# Altium PCB FullSheetOLD.PcbDoc (part 7 of 8)
Units mm, origin at the board's own origin, x right, y up, seen from the top; angles counter-clockwise.
Board outline 132.46 x 194.44 mm, 4 copper layers (Top Copper, L2_GND, L3_PWR_SIG, Bottom Copper), stack 1.586 mm thick; 495 components, 210 nets, 2171 pads, 1027 vias.
Unrouted connection lines stored in the file: 53.
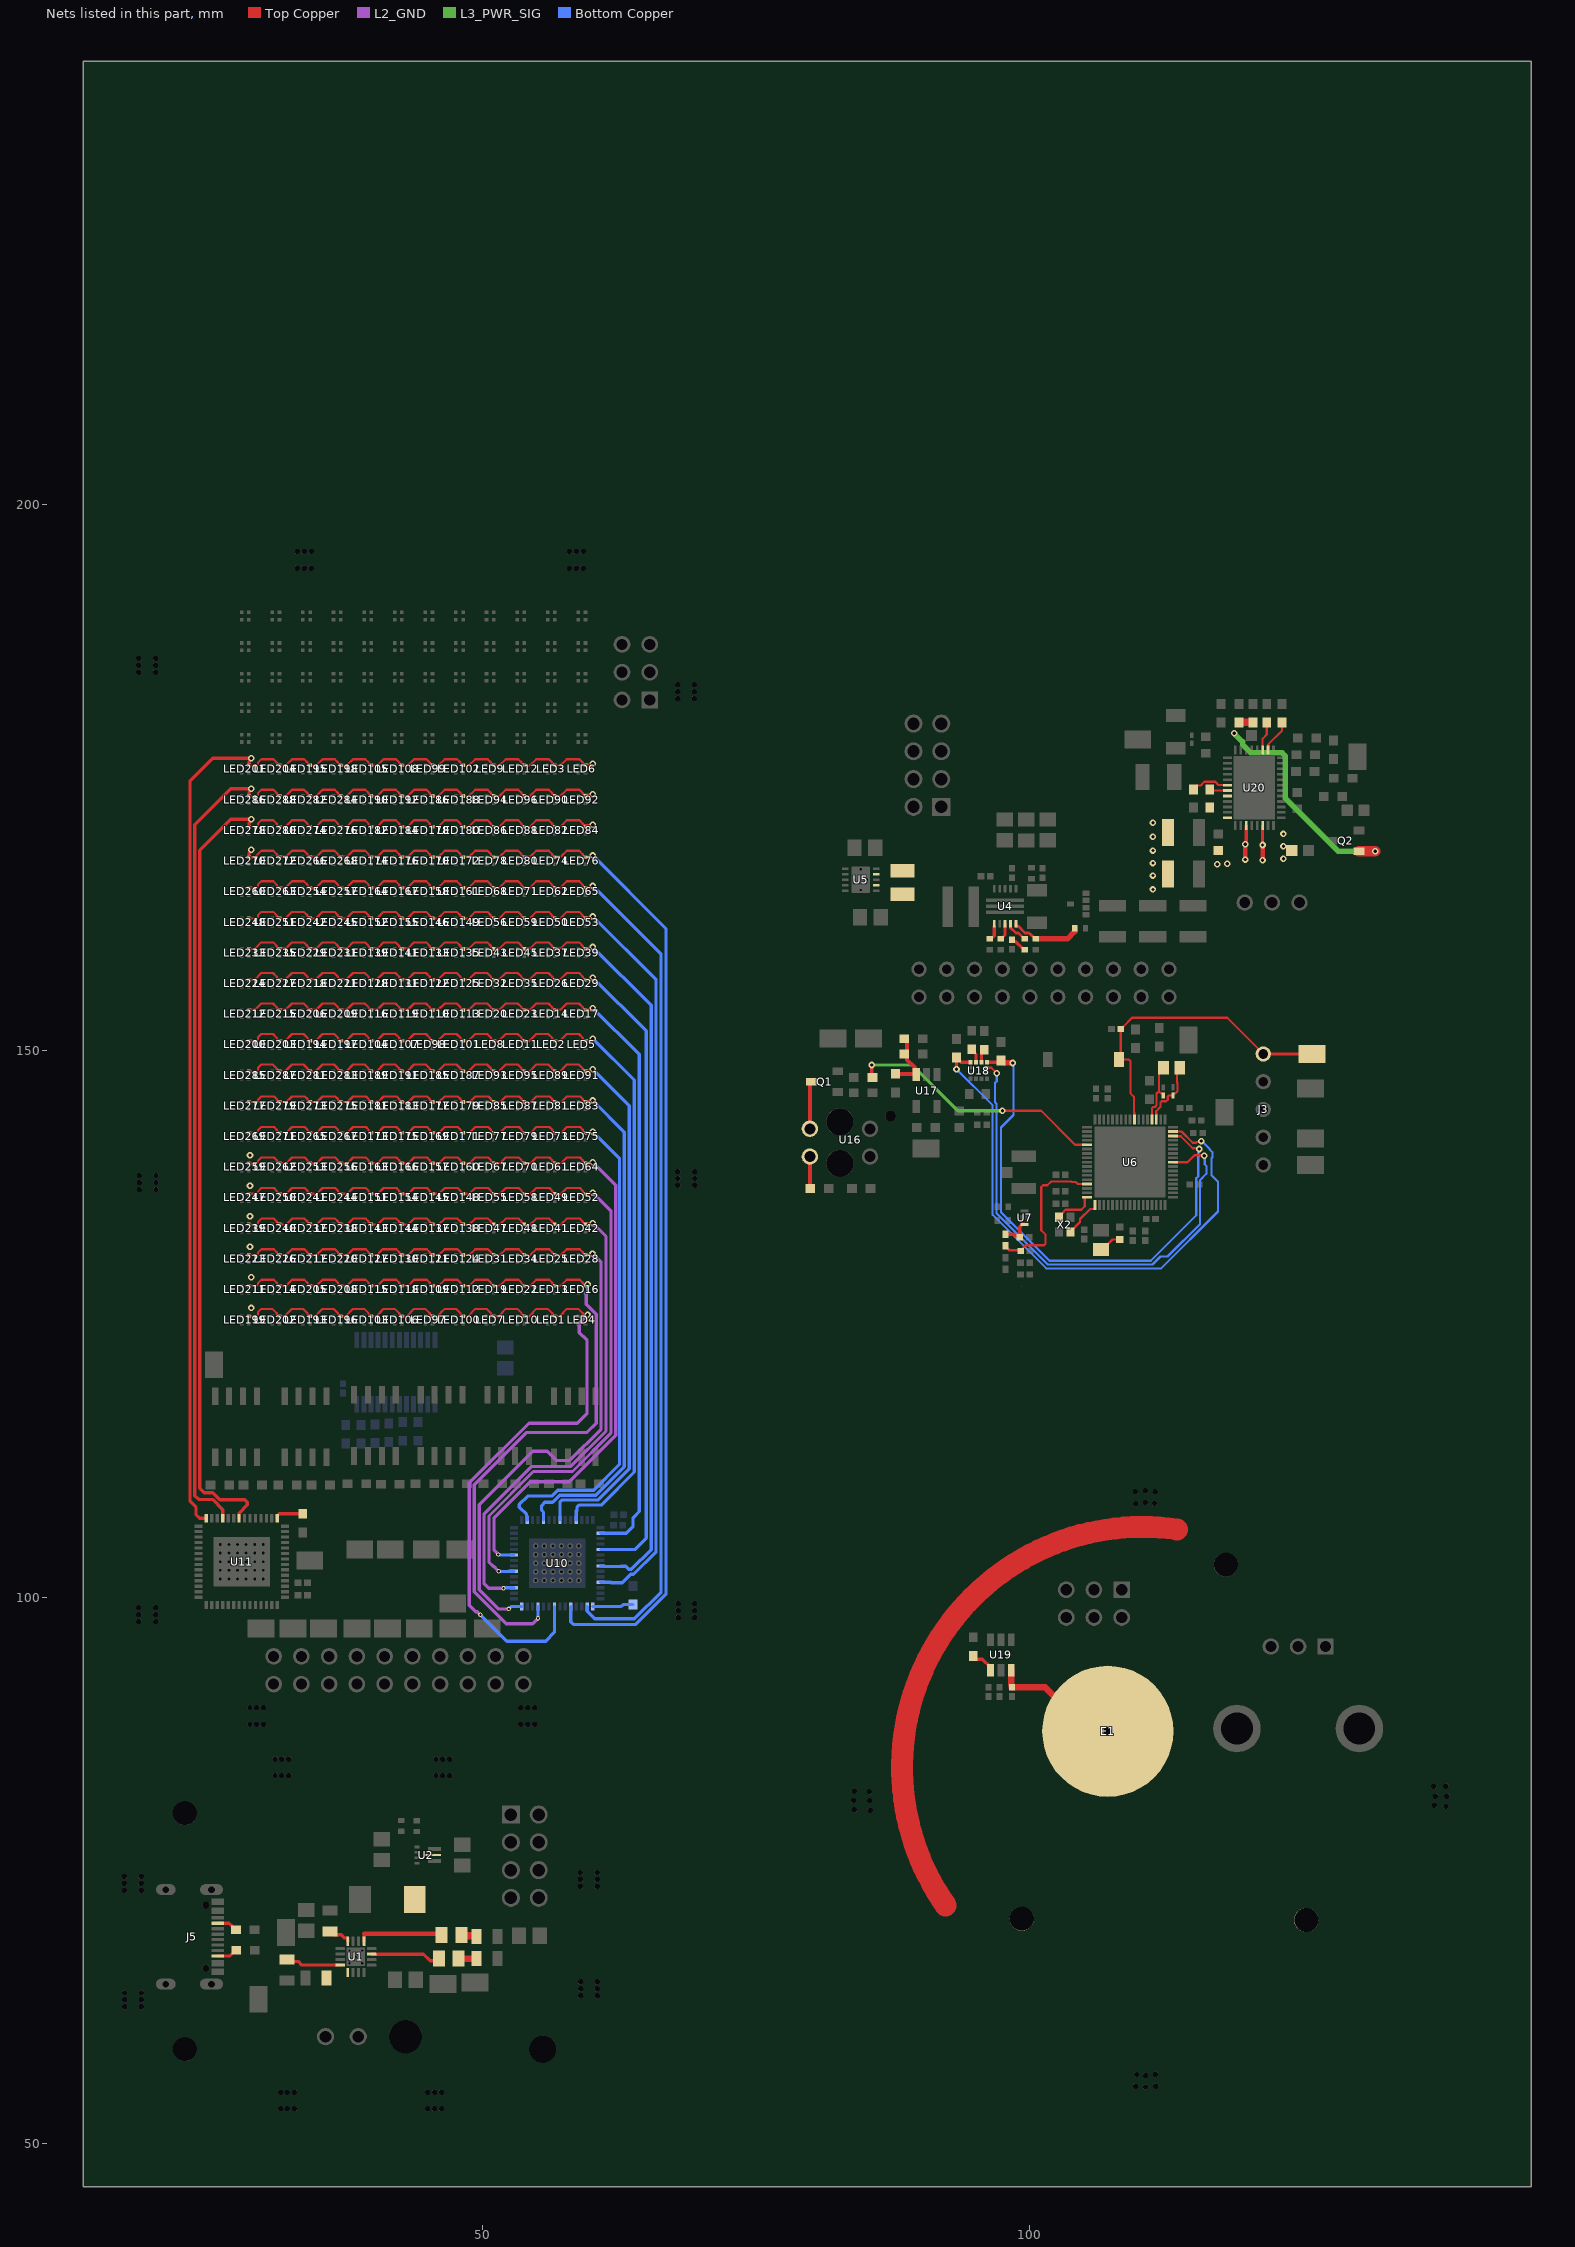
[diagram p8: the nets of this part, all layers, seen from the top]

## Via types
v1: diameter 0.6, hole 0.3, Top Copper to Bottom Copper, 857 vias
v2: diameter 0.8, hole 0.4, Top Copper to Bottom Copper, 91 vias
v3: diameter 0.4, hole 0.2, Top Copper to Bottom Copper, 79 vias

## Nets (pads, with @x,y where several pads share a name; then routed paths per layer and width w, separated by ;. In a path a pad name is that pad's centre, name@x,y a point inside that pad or via, vN(x,y) a via of type N, cw(c..) or ccw(c..) an arc to the next point about the centre after c; other vN are vias at no path point) (continued)
NetC16_2: C16.2 R14.1 | length 1.5
  Top Copper w0.3: C16.2@98.425,160.166 98.425,160.145 98.561,160.009 98.783,160.009 99.518,159.274 R14.1@99.518,159.202
NetC35_1: C35.1 L6.1 U6.31 | length 14
  Top Copper w0.2: C35.1@99.198,131.78 99.318,131.78 99.417,131.88 99.417,131.992 99.656,132.23 101.356,132.23 101.473,132.347 101.473,133.223 101.092,133.604 101.092,137.541 101.261,137.71 101.658,137.71 101.994,138.046 103.855,138.046 103.901,138 104.282,138 104.455,137.827 U6.31@105.296,137.827
  Top Copper w0.25: L6.1@97.841,132.182 97.841,132.105 98.166,131.78 C35.1@99.198,131.78
NetC36_2: C36.2 L6.2 U7.1 | length 2.9
  Top Copper w0.3: L6.2@97.841,133.223 98.57,133.223 98.688,133.105 99.003,133.105 C36.2@99.139,132.969 99.139,133.904 99.373,134.137 U7.1@99.568,134.137
NetC49_2: C49.2 E1.1 pad.4@99.314,70.612 pad.4@125.349,70.485 U19.3 | length 63.2
  Top Copper w0.6: U19.3@98.359,93.338 98.364,93.333 98.364,92.433 98.368,92.428 98.368,92.035 98.417,91.986 98.417,91.797 C49.2@98.425,91.789 101.447,91.789 105.479,87.757 E1.1@107.188,87.757
  Top Copper w2: 92.35,71.824 cw(c110.363,84.455) 113.51,106.229
NetC54_2: C54.2 U20.8
NetC55_1: C55.1 U20.7 | length 1.7
  Top Copper w0.2: C55.1@116.522,173.927 116.621,173.828 U20.7@118.145,173.828
NetC55_2: C55.2 U20.6 | length 3.6
  Top Copper w0.2: C55.2@115.022,173.927 115.022,173.976 115.323,174.277 115.669,174.277 116.019,174.627 117.026,174.627 117.172,174.48 117.172,174.445 117.29,174.328 U20.6@118.145,174.328
NetD1_A: D1.A R1.1 | length 1.4
  Top Copper w0.7: D1.A@48.042,69.113 48.106,69.05 49.36,69.05 R1.1@49.423,68.986
NetD1_C: D1.C U1.9 | length 7.8
  Top Copper w0.3: U1.9@39.141,68.554 39.141,69.221 39.161,69.24
  Top Copper w0.4: 39.161,69.24 46.115,69.24 D1.C@46.242,69.113
NetD2_A: D2.A R2.1 | length 1.6
  Top Copper w0.6: D2.A@47.799,66.954 R2.1@49.423,66.954
NetD2_C: D2.C U1.7 | length 6.6
  Top Copper w0.3: U1.7@39.826,67.369 44.576,67.369 45.175,66.77 45.974,66.77 45.999,66.796 D2.C@45.999,66.954
NetJ5_A5: J5.A5 R50.2 | length 1.9
  Top Copper w0.3: J5.A5@25.756,70.199 26.781,70.199 27.12,69.859 27.12,69.846 27.37,69.596 R50.2@27.42,69.596
NetJ5_B5: J5.B5 R51.1 | length 1.9
  Top Copper w0.3: J5.B5@25.756,67.199 26.873,67.199 R51.1@27.392,67.718
NetL1_2: L1.2 U2.2
NetL3_1: L3.1 U5.2
NetL3_2: L3.2 U5.4
NetL4_1: L4.1 L5.2 | length 2.1
  Top Copper w0.2: L5.2@106.553,131.841 106.695,131.841 107.612,132.758 L4.1@108.27,132.758
NetQ1_3: Q1.3 U16.CATH | length 4.4
  Top Copper w0.381: U16.CATH@79.927,142.88 79.927,147.093 80.027,147.193 Q1.3@80.08,147.193
NetQ2_1: Q2.1 R63.2 R64.2 | length 22.5
  Top Copper w0.7: R63.2@119.189,180.062 R64.2@120.459,180.062
  Top Copper w1: Q2.1@130.168,168.277 131.644,168.277 v1(131.648,168.274)
  L3_PWR_SIG w0.5: v1(118.745,179.07) 119.524,178.291 119.524,178.037 120.283,177.278 123.131,177.278 123.424,176.985 123.424,173.121 128.271,168.274 v1(131.648,168.274)
NetR3_2: R3.2 U1.1
NetR4_2: R4.2 U1.12 | length 2.1
  Top Copper w0.3: R4.2@36.017,69.444 36.327,69.134 37.062,69.134 37.361,68.834 37.621,68.834 37.641,68.814 U1.12@37.641,68.554
NetR5_2: R5.2 U1.16 | length 5.1
  Top Copper w0.25: R5.2@32.106,66.878 R5.2@32.283,66.7
  Top Copper w0.3: R5.2@32.283,66.7 33.096,66.7 33.427,66.369 U1.16@36.956,66.369
NetR10_1: R10.1 R13.2 U4.5 | length 6.6
  Top Copper w0.25: U4.5@98.79,161.637 98.79,161.412 99.015,161.412 99.628,160.799 99.982,160.799 100.098,160.683 100.125,160.683 100.534,160.274 R13.2@100.584,160.274
  Top Copper w0.5: R13.2@100.584,160.274 101.208,160.274 101.219,160.263 103.497,160.263 104.144,160.91 R10.1@104.144,161.223
NetR11_2: R11.2 U4.1 | length 1.4
  Top Copper w0.3: R11.2@96.393,160.274 96.493,160.374 96.611,160.374 96.787,160.55 U4.1@96.787,161.437
NetR12_2: R12.2 U4.3 | length 1.6
  Top Copper w0.25: R12.2@97.409,160.274 97.459,160.274 97.79,160.605 U4.3@97.79,161.637
NetR14_2: R14.2 U4.4 | length 2.1
  Top Copper w0.25: U4.4@98.29,161.637 98.29,161.273 98.777,160.786 99.006,160.786 99.518,160.274 R14.2@99.568,160.274
NetR22_2: R22.2 U10.1 | length 3.8
  Bottom Copper w0.3: U10.1@60.057,99.176 62.655,99.176 62.832,99.353 R22.2@63.754,99.353
NetR23_2: R23.2 U11.1 | length 2.6
  Top Copper w0.3: U11.1@31.203,107.237 31.203,107.481 31.378,107.657 R23.2@33.528,107.657
NetR40_2: R40.2 U16.A | length 2.9
  Top Copper w0.381: U16.A@79.927,140.34 79.944,140.323 79.944,137.431 R40.2@79.961,137.414
NetR41_1: R41.1 R43.1 R44.2 U17.3 | length 5.7
  Top Copper w0.381: R44.2@87.757,147.916 87.787,147.887 89.637,147.887 89.662,147.861 U17.3@89.662,147.857 89.527,147.992 89.527,148.471 88.818,149.18 88.818,149.523 88.608,149.733 R41.1@88.558,149.733 ; R41.1@88.812,149.86 R43.1@88.812,151.257
NetR42_1: R42.1 U6.22 | length 23.9
  Top Copper w0.2: v1(97.547,144.526) 101.087,144.526 104.186,141.427 U6.22@105.296,141.427
  Top Copper w0.3: v1(85.598,148.717) 85.598,147.623 R42.1@85.647,147.574
  L3_PWR_SIG w0.3: v1(85.598,148.717) 89.281,148.717 93.472,144.526 v1(97.547,144.526)
NetR46_1: R46.1 U6.67 U18.4 | length 52.3
  Top Copper w0.2: U6.67@113.144,142.627 113.934,142.627 114.956,141.605 115.237,141.605 115.314,141.681 115.661,141.681 v1(115.737,141.758)
  Top Copper w0.3: v1(93.345,148.336) R46.1@93.345,149.391 93.345,149.341 93.595,149.091 93.649,149.091 93.771,148.969 U18.4@94.627,148.969
  Bottom Copper w0.2: v1(93.345,148.336) 96.647,145.034 96.647,135.014 101.551,130.11 112.063,130.11 117.263,135.31 117.263,138.036 116.671,138.628 116.671,140.182 116.755,140.266 116.755,140.733 116.483,141.005 116.483,141.062 115.788,141.758 v1(115.737,141.758)
NetR47_1: R47.1 U6.66 U18.1 | length 46.6
  Top Copper w0.2: U6.66@113.144,142.227 113.167,142.204 113.862,142.204 114.959,141.107 115.477,141.107 v1(115.554,141.031)
  Top Copper w0.3: U18.1@96.127,148.969 R47.1@97.026,148.969
  Top Copper w0.5: R47.1@97.538,149.008 97.538,148.958 97.559,148.937 98.415,148.937 98.453,148.899 v1(98.48,148.899)
  Bottom Copper w0.2: v1(98.48,148.899) 98.552,148.827 98.552,144.145 97.409,143.002 97.409,135.255 101.854,130.81 111.125,130.81 115.284,134.969 115.284,138.348 115.453,138.517 115.453,140.64 115.477,140.663 115.477,140.954 v1(115.554,141.031)
NetR48_1: R48.1 U18.2 | length 1.3
  Top Copper w0.3: U18.2@95.627,148.969 95.627,149.806 95.885,150.064 R48.1@95.885,150.114
NetR49_2: R49.2 U18.3 | length 1.3
  Top Copper w0.3: R49.2@94.742,150.153 94.742,150.103 95.127,149.718 U18.3@95.127,148.969
NetR53_2: R53.2 U19.1 | length 2.3
  Top Copper w0.3: R53.2@94.869,94.654 94.869,94.604 95.119,94.354 95.71,94.354 96.459,93.605 U19.1@96.459,93.338
NetR57_2: R57.2 U20.35 | length 2.7
  Top Copper w0.2: U20.35@121.349,177.531 121.349,178.571 121.73,178.952 R57.2@121.73,180.062
NetR58_2: R58.2 U20.34 | length 3.1
  Top Copper w0.2: U20.34@121.849,177.531 121.87,177.552 121.87,178.055 123.126,179.312 R58.2@123.126,180.062
NetU6_60: U6.60 U18.12 | length 45.8
  Top Copper w0.2: U18.12@96.137,148.459 96.524,148.459 v1(97.028,147.955) ; U6.60@113.144,139.827 114.482,139.827 115.117,140.462 115.953,140.462 v1(116.003,140.412)
  Bottom Copper w0.2: v1(97.028,147.955) 97.028,147.236 96.859,147.067 96.859,145.317 96.997,145.179 96.997,135.159 101.696,130.46 111.27,130.46 112.001,131.191 112.649,131.191 115.634,134.176 115.634,138.203 116.205,138.773 116.205,139.489 116.055,139.639 116.055,140.36 v1(116.003,140.412)
NRST: C19.2 J3.5 SW1.2 TP9.1 U6.8 | length 28.7
  Top Copper w0.2: U6.8@109.62,143.751 109.597,143.774 109.597,144.38 109.57,144.407 109.57,145.823 109.248,146.145 109.248,149.08 109.103,149.225 SW1.2@108.204,149.225 108.379,149.4 C19.2@108.379,152.019 108.4,152.019 108.586,152.205 108.586,152.227 109.395,153.035 118.11,153.035 J3.5@121.412,149.733
  Top Copper w0.3: J3.5@121.412,149.733 TP9.1@125.857,149.733
OSC_IN: U6.35 X2.1 | length 3.6
  Top Copper w0.2: X2.1@103.776,133.437 103.776,133.475 104.648,134.347 104.648,134.62 105.573,135.545 105.993,135.545 106.02,135.572 U6.35@106.02,135.903
OSC_OUT: U6.34 X2.3 | length 3.9
  Top Copper w0.2: X2.3@102.726,134.787 102.726,134.825 103.145,135.244 103.145,135.31 103.302,135.467 104.749,135.467 105.071,135.789 105.071,136.6 105.098,136.627 U6.34@105.296,136.627
PC14-OSC32_IN: C30.2 U6.3 X1.1 | length 5.8
  Top Copper w0.2: U6.3@111.62,143.751 111.611,143.76 111.611,144.496 111.998,144.882 111.998,145.279 112.115,145.396 112.524,145.396 112.67,145.543 112.67,145.809 112.788,145.926 C30.2@113.157,145.926 ; C30.2@113.157,146.05 113.209,146.102 113.36,146.102 113.559,146.302 113.559,147.062 113.526,147.096 X1.1@113.526,148.336
PC15-OSC32_OUT: C31.2 U6.4 X1.2 | length 5.5
  Top Copper w0.2: U6.4@111.22,143.751 111.243,143.774 111.243,144.764 111.36,144.881 111.502,144.881 111.648,145.027 111.648,145.746 111.648,146.108 111.816,146.276 111.889,146.276 ; X1.2@112.026,148.336 111.866,148.176 111.866,146.299 111.889,146.276 ; C31.2@112.268,146.047 112.216,146.1 112.065,146.1 111.889,146.276
PGND: C52.1 C53.1 C_VM_BK1.2 J10.1 U20.12 U20.15 U20.18 | length 6.7
  Top Copper w0.2: C53.1@112.435,169.737 C53.1@112.687,169.989
  Top Copper w0.3: v1(119.761,168.91) 119.761,168.991 119.848,169.079 U20.15@119.848,170.624 ; v1(121.349,168.846) U20.18@121.349,170.624
  Top Copper w0.4: v1(119.761,167.513) v1(119.761,168.91) ; v1(121.349,167.45) v1(121.349,168.846)
  other v1: 111.316,164.782 111.316,166.052 117.197,167.074 118.11,167.132 111.316,167.195 123.253,167.576 111.316,168.338 123.253,168.719 111.316,169.608 123.253,169.862 111.316,170.879
R0: LED1.3 LED4.3 LED7.3 LED10.3 LED97.3 LED100.3 LED103.3 LED106.3 LED193.3 LED196.3 LED199.3 LED202.3 U10.8 | length 84.2
  Top Copper w0.2: LED199.3@28.6,125.73 29.305,125.73 29.422,125.847 29.422,126.085 29.744,126.407 30.747,126.407 31.155,125.999 31.155,125.912 31.272,125.795 31.335,125.795 LED202.3@31.4,125.73 31.865,125.73 32.202,126.067 32.202,126.07 32.538,126.407 33.547,126.407 33.955,125.999 33.955,125.912 34.072,125.795 34.135,125.795 LED193.3@34.2,125.73 34.665,125.73 34.999,126.064 34.999,126.073 35.332,126.407 36.347,126.407 36.755,125.999 36.755,125.912 36.872,125.795 36.935,125.795 LED196.3@37,125.73 37.465,125.73 37.796,126.061 37.796,126.076 38.126,126.407 39.147,126.407 39.555,125.999 39.555,125.912 39.672,125.795 39.735,125.795 LED103.3@39.8,125.73 40.265,125.73 40.593,126.058 40.593,126.079 40.92,126.407 41.947,126.407 42.355,125.999 42.355,125.912 42.472,125.795 42.535,125.795 LED106.3@42.6,125.73 43.065,125.73 43.39,126.055 43.39,126.082 43.714,126.407 44.747,126.407 45.155,125.999 45.155,125.912 45.272,125.795 45.335,125.795 LED97.3@45.4,125.73 45.865,125.73 46.186,126.051 46.186,126.085 46.508,126.407 47.547,126.407 47.955,125.999 47.955,125.912 48.072,125.795 48.135,125.795 LED100.3@48.2,125.73 48.665,125.73 48.98,126.045 48.98,126.085 49.302,126.407 50.347,126.407 50.755,125.999 50.755,125.912 50.872,125.795 50.935,125.795 LED7.3@51,125.73 51.465,125.73 51.774,126.039 51.774,126.085 52.096,126.407 53.147,126.407 53.555,125.999 53.555,125.912 53.672,125.795 53.735,125.795 LED10.3@53.8,125.73 54.265,125.73 54.568,126.033 54.568,126.085 54.89,126.407 55.947,126.407 56.355,125.999 56.355,125.912 56.472,125.795 56.535,125.795 LED1.3@56.6,125.73 57.065,125.73 57.362,126.027 57.362,126.085 57.684,126.407 58.747,126.407 59.155,125.999 59.155,125.912 59.272,125.795 59.335,125.795 LED4.3@59.4,125.73
  Top Copper w0.3: LED4.3@59.4,125.73 59.527,125.857 v1(59.59,125.857)
  L2_GND w0.3: v3(49.784,98.425) 49.757,98.425 49.487,98.695 49.35,98.695 48.768,99.277 48.768,110.491 54.228,115.951 58.66,115.951 59.528,116.819 59.528,123.566 59.177,123.917 59.13,123.917 58.836,124.211 58.836,125.103 v1(59.59,125.857)
  Bottom Copper w0.3: v3(49.784,98.425) 52.208,96.001 55.754,96.001 56.557,96.804 U10.8@56.557,99.176
  other v1: 28.829,126.492
R1: LED13.3 LED16.3 LED19.3 LED22.3 LED109.3 LED112.3 LED115.3 LED118.3 LED205.3 LED208.3 LED211.3 LED214.3 U10.11 | length 81.3
  Top Copper w0.2: LED211.3@28.6,128.53 29.305,128.53 29.422,128.647 29.422,128.752 29.744,129.074 30.88,129.074 31.155,128.799 31.155,128.712 31.272,128.595 31.335,128.595 LED214.3@31.4,128.53 31.994,128.53 32.538,129.074 33.68,129.074 33.955,128.799 33.955,128.712 34.072,128.595 34.135,128.595 LED205.3@34.2,128.53 34.788,128.53 35.332,129.074 36.48,129.074 36.755,128.799 36.755,128.712 36.872,128.595 36.935,128.595 LED208.3@37,128.53 37.582,128.53 38.126,129.074 39.28,129.074 39.555,128.799 39.555,128.712 39.672,128.595 39.735,128.595 LED115.3@39.8,128.53 40.376,128.53 40.92,129.074 42.08,129.074 42.355,128.799 42.355,128.712 42.472,128.595 42.535,128.595 LED118.3@42.6,128.53 43.17,128.53 43.714,129.074 44.88,129.074 45.155,128.799 45.155,128.712 45.272,128.595 45.335,128.595 LED109.3@45.4,128.53 45.964,128.53 46.508,129.074 47.68,129.074 47.955,128.799 47.955,128.712 48.072,128.595 48.135,128.595 LED112.3@48.2,128.53 48.758,128.53 49.302,129.074 50.48,129.074 50.755,128.799 50.755,128.712 50.872,128.595 50.935,128.595 LED19.3@51,128.53 51.552,128.53 52.096,129.074 53.28,129.074 53.555,128.799 53.555,128.712 53.672,128.595 53.735,128.595 LED22.3@53.8,128.53 54.346,128.53 54.89,129.074 56.08,129.074 56.355,128.799 56.355,128.712 56.472,128.595 56.535,128.595 LED13.3@56.6,128.53 57.14,128.53 57.684,129.074 58.88,129.074 59.155,128.799 59.155,128.712 59.272,128.595 59.335,128.595 LED16.3@59.4,128.53
  Top Copper w0.3: LED16.3@59.4,128.53 59.521,128.651 v1(59.59,128.651)
  L2_GND w0.3: v3(55.057,98.105) 54.557,97.605 52.135,97.605 49.218,100.522 49.218,110.305 54.015,115.102 59.537,115.102 60.375,115.94 60.375,125.921 59.471,126.825 59.471,127.792 59.58,127.901 59.58,128.641 v1(59.59,128.651)
  Bottom Copper w0.3: v3(55.057,98.105) U10.11@55.057,99.176
  other v1: 28.829,129.286
R2: LED25.3 LED28.3 LED31.3 LED34.3 LED121.3 LED124.3 LED127.3 LED130.3 LED217.3 LED220.3 LED223.3 LED226.3 U10.14 | length 80.6
  Top Copper w0.2: LED223.3@28.6,131.33 29.305,131.33 29.422,131.447 29.422,131.546 29.744,131.868 30.886,131.868 31.155,131.599 31.155,131.512 31.272,131.395 31.335,131.395 LED226.3@31.4,131.33 32,131.33 32.538,131.868 33.686,131.868 33.955,131.599 33.955,131.512 34.072,131.395 34.135,131.395 LED217.3@34.2,131.33 34.794,131.33 35.332,131.868 36.486,131.868 36.755,131.599 36.755,131.512 36.872,131.395 36.935,131.395 LED220.3@37,131.33 37.588,131.33 38.126,131.868 39.286,131.868 39.555,131.599 39.555,131.512 39.672,131.395 39.735,131.395 LED127.3@39.8,131.33 40.382,131.33 40.498,131.446 40.498,131.546 40.82,131.868 42.086,131.868 42.355,131.599 42.355,131.512 42.472,131.395 42.535,131.395 LED130.3@42.6,131.33 43.176,131.33 43.714,131.868 44.886,131.868 45.155,131.599 45.155,131.512 45.272,131.395 45.335,131.395 LED121.3@45.4,131.33 45.97,131.33 46.508,131.868 47.686,131.868 47.955,131.599 47.955,131.512 48.072,131.395 48.135,131.395 LED124.3@48.2,131.33 48.764,131.33 49.302,131.868 50.486,131.868 50.755,131.599 50.755,131.512 50.872,131.395 50.935,131.395 LED31.3@51,131.33 51.558,131.33 52.096,131.868 53.286,131.868 53.555,131.599 53.555,131.512 53.672,131.395 53.735,131.395 LED34.3@53.8,131.33 54.352,131.33 54.89,131.868 56.086,131.868 56.355,131.599 56.355,131.512 56.472,131.395 56.535,131.395 LED25.3@56.6,131.33 57.146,131.33 57.684,131.868 58.886,131.868 59.155,131.599 59.155,131.512 59.272,131.395 59.335,131.395 LED28.3@59.4,131.33 59.457,131.387 59.983,131.387 v1(60.04,131.445)
  L2_GND w0.3: v3(52.378,98.952) 51.425,98.952 49.668,100.709 49.668,108.487 54.555,113.374 55.903,113.374 56.736,112.541 57.954,112.541 60.825,115.412 60.825,130.66 v1(60.04,131.445)
  Bottom Copper w0.3: v3(52.378,98.952) 52.405,98.952 52.629,99.176 U10.14@53.557,99.176
R3: LED41.3 LED42.3 LED47.3 LED48.3 LED137.3 LED138.3 LED143.3 LED144.3 LED237.3 LED238.3 LED239.3 LED240.3 U10.17 | length 80.1
  Top Copper w0.2: LED239.3@28.6,134.13 29.305,134.13 29.422,134.247 29.422,134.34 29.744,134.662 30.892,134.662 31.155,134.399 31.155,134.312 31.272,134.195 31.335,134.195 LED240.3@31.4,134.13 32.006,134.13 32.538,134.662 33.692,134.662 33.955,134.399 33.955,134.312 34.072,134.195 34.135,134.195 LED237.3@34.2,134.13 34.8,134.13 35.332,134.662 36.492,134.662 36.755,134.399 36.755,134.312 36.872,134.195 36.935,134.195 LED238.3@37,134.13 37.594,134.13 38.126,134.662 39.292,134.662 39.555,134.399 39.555,134.312 39.672,134.195 39.735,134.195 LED143.3@39.8,134.13 40.388,134.13 40.92,134.662 42.092,134.662 42.355,134.399 42.355,134.312 42.472,134.195 42.535,134.195 LED144.3@42.6,134.13 43.182,134.13 43.714,134.662 44.892,134.662 45.155,134.399 45.155,134.312 45.272,134.195 45.335,134.195 LED137.3@45.4,134.13 45.976,134.13 46.508,134.662 47.692,134.662 47.955,134.399 47.955,134.312 48.072,134.195 48.135,134.195 LED138.3@48.2,134.13 48.77,134.13 49.302,134.662 50.492,134.662 50.755,134.399 50.755,134.312 50.872,134.195 50.935,134.195 LED47.3@51,134.13 51.564,134.13 52.096,134.662 53.292,134.662 53.555,134.399 53.555,134.312 53.672,134.195 53.735,134.195 LED48.3@53.8,134.13 54.358,134.13 54.89,134.662 56.092,134.662 56.355,134.399 56.355,134.312 56.472,134.195 56.535,134.195 LED41.3@56.6,134.13 57.152,134.13 57.684,134.662 58.892,134.662 59.155,134.399 59.155,134.312 59.272,134.195 59.335,134.195 LED42.3@59.4,134.13
  Top Copper w0.3: LED42.3@59.4,134.13 59.415,134.145 59.896,134.145 59.99,134.239 v1(60.071,134.239)
  L2_GND w0.3: v3(51.896,100.836) 50.548,100.836 50.118,101.266 50.118,107.649 54.443,111.974 58.024,111.974 61.275,115.225 61.275,133.035 v1(60.071,134.239)
  Bottom Copper w0.3: v3(51.896,100.836) 51.923,100.836 51.973,100.886 U10.17@52.846,100.886
  other v1: 28.702,132.08
R4: LED49.3 LED52.3 LED55.3 LED58.3 LED145.3 LED148.3 LED151.3 LED154.3 LED241.3 LED244.3 LED247.3 LED250.3 U10.20 | length 80.8
  Top Copper w0.2: LED247.3@28.6,136.93 29.305,136.93 29.422,137.047 29.422,137.134 29.744,137.456 30.898,137.456 31.155,137.199 31.155,137.112 31.272,136.995 31.335,136.995 LED250.3@31.4,136.93 32.012,136.93 32.538,137.456 33.698,137.456 33.955,137.199 33.955,137.112 34.072,136.995 34.135,136.995 LED241.3@34.2,136.93 34.806,136.93 35.332,137.456 36.498,137.456 36.755,137.199 36.755,137.112 36.872,136.995 36.935,136.995 LED244.3@37,136.93 37.6,136.93 38.126,137.456 39.298,137.456 39.555,137.199 39.555,137.112 39.672,136.995 39.735,136.995 LED151.3@39.8,136.93 40.394,136.93 40.92,137.456 42.098,137.456 42.355,137.199 42.355,137.112 42.472,136.995 42.535,136.995 LED154.3@42.6,136.93 43.188,136.93 43.714,137.456 44.898,137.456 45.155,137.199 45.155,137.112 45.272,136.995 45.335,136.995 LED145.3@45.4,136.93 45.982,136.93 46.508,137.456 47.698,137.456 47.955,137.199 47.955,137.112 48.072,136.995 48.135,136.995 LED148.3@48.2,136.93 48.776,136.93 49.302,137.456 50.498,137.456 50.755,137.199 50.755,137.112 50.872,136.995 50.935,136.995 LED55.3@51,136.93 51.57,136.93 52.096,137.456 53.298,137.456 53.555,137.199 53.555,137.112 53.672,136.995 53.735,136.995 LED58.3@53.8,136.93 54.364,136.93 54.89,137.456 56.098,137.456 56.355,137.199 56.355,137.112 56.472,136.995 56.535,136.995 LED49.3@56.6,136.93 57.158,136.93 57.684,137.456 58.898,137.456 59.155,137.199 59.155,137.112 59.272,136.995 59.335,136.995 LED52.3@59.4,136.93
  Top Copper w0.3: LED52.3@59.4,136.93 59.415,136.945 59.902,136.945 59.99,137.033 v1(60.071,137.033)
  L2_GND w0.3: v3(51.466,102.392) 51.439,102.392 50.995,102.835 50.962,102.835 50.568,103.229 50.568,107.454 54.638,111.524 58.21,111.524 61.725,115.039 61.725,135.379 v1(60.071,137.033)
  Bottom Copper w0.3: v3(51.466,102.392) 51.493,102.392 51.515,102.37 52.332,102.37 52.348,102.386 U10.20@52.846,102.387
  other v1: 28.702,134.874 28.702,137.668
R5: LED61.3 LED64.3 LED67.3 LED70.3 LED157.3 LED160.3 LED163.3 LED166.3 LED253.3 LED256.3 LED259.3 LED262.3 U10.23 | length 82
  Top Copper w0.2: LED259.3@28.6,139.73 29.305,139.73 29.422,139.847 29.422,139.928 29.744,140.25 30.904,140.25 31.155,139.999 31.155,139.912 31.272,139.795 31.335,139.795 LED262.3@31.4,139.73 32.018,139.73 32.538,140.25 33.704,140.25 33.955,139.999 33.955,139.912 34.072,139.795 34.135,139.795 LED253.3@34.2,139.73 34.812,139.73 35.332,140.25 36.504,140.25 36.755,139.999 36.755,139.912 36.872,139.795 36.935,139.795 LED256.3@37,139.73 37.606,139.73 38.126,140.25 39.304,140.25 39.555,139.999 39.555,139.912 39.672,139.795 39.735,139.795 LED163.3@39.8,139.73 40.4,139.73 40.567,139.896 40.567,139.944 40.889,140.266 41.344,140.266 41.361,140.25 42.104,140.25 42.355,139.999 42.355,139.912 42.472,139.795 42.535,139.795 LED166.3@42.6,139.73 43.194,139.73 43.714,140.25 44.904,140.25 45.155,139.999 45.155,139.912 45.272,139.795 45.335,139.795 LED157.3@45.4,139.73 45.988,139.73 46.508,140.25 47.704,140.25 47.955,139.999 47.955,139.912 48.072,139.795 48.135,139.795 LED160.3@48.2,139.73 48.782,139.73 49.302,140.25 50.504,140.25 50.755,139.999 50.755,139.912 50.872,139.795 50.935,139.795 LED67.3@51,139.73 51.576,139.73 52.096,140.25 53.304,140.25 53.555,139.999 53.555,139.912 53.672,139.795 53.735,139.795 LED70.3@53.8,139.73 54.37,139.73 54.89,140.25 56.104,140.25 56.355,139.999 56.355,139.912 56.472,139.795 56.535,139.795 LED61.3@56.6,139.73 57.164,139.73 57.684,140.25 58.904,140.25 59.155,139.999 59.155,139.912 59.272,139.795 59.335,139.795 LED64.3@59.4,139.73
  Top Copper w0.3: LED64.3@59.4,139.73 59.415,139.745 59.908,139.745 59.99,139.827 v1(60.071,139.827)
  L2_GND w0.3: v3(51.419,103.935) 51.419,103.962 51.018,104.363 51.018,107.268 54.348,110.598 57.92,110.598 62.175,114.853 62.175,137.723 v1(60.071,139.827)
  Bottom Copper w0.3: v3(51.419,103.935) 51.446,103.935 51.494,103.887 U10.23@52.846,103.887
  other v1: 28.702,140.462
R6: LED73.3 LED75.3 LED77.3 LED79.3 LED169.3 LED171.3 LED173.3 LED175.3 LED265.3 LED267.3 LED269.3 LED271.3 U10.30 | length 80.6
  Top Copper w0.2: LED269.3@28.6,142.53 29.305,142.53 29.422,142.647 29.422,142.722 29.744,143.044 30.91,143.044 31.155,142.799 31.155,142.712 31.272,142.595 31.335,142.595 LED271.3@31.4,142.53 32.024,142.53 32.538,143.044 33.71,143.044 33.955,142.799 33.955,142.712 34.072,142.595 34.135,142.595 LED265.3@34.2,142.53 34.818,142.53 35.332,143.044 36.51,143.044 36.755,142.799 36.755,142.712 36.872,142.595 36.935,142.595 LED267.3@37,142.53 37.612,142.53 38.126,143.044 39.31,143.044 39.555,142.799 39.555,142.712 39.672,142.595 39.735,142.595 LED173.3@39.8,142.53 40.406,142.53 40.92,143.044 42.11,143.044 42.355,142.799 42.355,142.712 42.472,142.595 42.535,142.595 LED175.3@42.6,142.53 43.2,142.53 43.714,143.044 44.91,143.044 45.155,142.799 45.155,142.712 45.272,142.595 45.335,142.595 LED169.3@45.4,142.53 45.994,142.53 46.508,143.044 47.71,143.044 47.955,142.799 47.955,142.712 48.072,142.595 48.135,142.595 LED171.3@48.2,142.53 48.788,142.53 49.302,143.044 50.51,143.044 50.755,142.799 50.755,142.712 50.872,142.595 50.935,142.595 LED77.3@51,142.53 51.582,142.53 52.096,143.044 53.31,143.044 53.555,142.799 53.555,142.712 53.672,142.595 53.735,142.595 LED79.3@53.8,142.53 54.376,142.53 54.89,143.044 56.11,143.044 56.355,142.799 56.355,142.712 56.472,142.595 56.535,142.595 LED73.3@56.6,142.53 57.17,142.53 57.684,143.044 58.91,143.044 59.155,142.799 59.155,142.712 59.272,142.595 59.335,142.595 LED75.3@59.4,142.53
  Top Copper w0.3: LED75.3@59.4,142.53 59.415,142.545 59.914,142.545 59.99,142.621 v1(60.071,142.621)
  Bottom Copper w0.3: U10.30@54.057,107.097 54.057,107.412 54.007,107.462 54.007,107.599 53.346,108.26 53.346,108.508 54.112,109.274 56.312,109.274 56.846,109.808 60.147,109.808 62.506,112.167 62.506,140.186 v1(60.071,142.621)
R7: LED81.3 LED83.3 LED85.3 LED87.3 LED177.3 LED179.3 LED181.3 LED183.3 LED273.3 LED275.3 LED277.3 LED279.3 U10.33 | length 81.9
  Top Copper w0.2: LED277.3@28.6,145.33 29.305,145.33 29.422,145.447 29.422,145.516 29.744,145.838 30.916,145.838 31.155,145.599 31.155,145.512 31.272,145.395 31.335,145.395 LED279.3@31.4,145.33 32.03,145.33 32.538,145.838 33.716,145.838 33.955,145.599 33.955,145.512 34.072,145.395 34.135,145.395 LED273.3@34.2,145.33 34.824,145.33 35.332,145.838 36.516,145.838 36.755,145.599 36.755,145.512 36.872,145.395 36.935,145.395 LED275.3@37,145.33 37.618,145.33 38.126,145.838 39.316,145.838 39.555,145.599 39.555,145.512 39.672,145.395 39.735,145.395 LED181.3@39.8,145.33 40.245,145.33 40.27,145.355 40.437,145.355 40.92,145.838 42.116,145.838 42.355,145.599 42.355,145.512 42.472,145.395 42.535,145.395 LED183.3@42.6,145.33 43.206,145.33 43.714,145.838 44.916,145.838 45.155,145.599 45.155,145.512 45.272,145.395 45.335,145.395 LED177.3@45.4,145.33 46,145.33 46.508,145.838 47.716,145.838 47.955,145.599 47.955,145.512 48.072,145.395 48.135,145.395 LED179.3@48.2,145.33 48.794,145.33 49.302,145.838 50.516,145.838 50.755,145.599 50.755,145.512 50.872,145.395 50.935,145.395 LED85.3@51,145.33 51.588,145.33 52.096,145.838 53.316,145.838 53.555,145.599 53.555,145.512 53.672,145.395 53.735,145.395 LED87.3@53.8,145.33 54.382,145.33 54.89,145.838 56.116,145.838 56.355,145.599 56.355,145.512 56.472,145.395 56.535,145.395 LED81.3@56.6,145.33 57.176,145.33 57.684,145.838 58.916,145.838 59.155,145.599 59.155,145.512 59.272,145.395 59.335,145.395 LED83.3@59.4,145.33
  Top Copper w0.3: LED83.3@59.4,145.33 59.415,145.345 59.865,145.345 59.99,145.469 v1(60.071,145.469)
  Bottom Copper w0.3: U10.33@55.557,107.097 55.557,107.82 55.38,107.997 55.38,108.411 55.68,108.711 56.385,108.711 57.033,109.358 60.333,109.358 62.956,111.981 62.956,142.584 v1(60.071,145.469)
R8: LED89.3 LED91.3 LED93.3 LED95.3 LED185.3 LED187.3 LED189.3 LED191.3 LED281.3 LED283.3 LED285.3 LED287.3 U10.36 | length 85.1
  Top Copper w0.2: LED285.3@28.6,148.13 29.305,148.13 29.422,148.247 29.422,148.437 29.744,148.759 30.795,148.759 31.155,148.399 31.155,148.312 31.272,148.195 31.335,148.195 LED287.3@31.4,148.13 31.909,148.13 32.538,148.759 33.595,148.759 33.955,148.399 33.955,148.312 34.072,148.195 34.135,148.195 LED281.3@34.2,148.13 34.703,148.13 35.332,148.759 36.395,148.759 36.755,148.399 36.755,148.312 36.872,148.195 36.935,148.195 LED283.3@37,148.13 37.497,148.13 38.126,148.759 39.195,148.759 39.555,148.399 39.555,148.312 39.672,148.195 39.735,148.195 LED189.3@39.8,148.13 40.291,148.13 40.92,148.759 41.995,148.759 42.355,148.399 42.355,148.312 42.472,148.195 42.535,148.195 LED191.3@42.6,148.13 43.085,148.13 43.714,148.759 44.795,148.759 45.155,148.399 45.155,148.312 45.272,148.195 45.335,148.195 LED185.3@45.4,148.13 45.879,148.13 46.508,148.759 47.595,148.759 47.955,148.399 47.955,148.312 48.072,148.195 48.135,148.195 LED187.3@48.2,148.13 48.673,148.13 49.302,148.759 50.395,148.759 50.755,148.399 50.755,148.312 50.872,148.195 50.935,148.195 LED93.3@51,148.13 51.467,148.13 52.096,148.759 53.195,148.759 53.555,148.399 53.555,148.312 53.672,148.195 53.735,148.195 LED95.3@53.8,148.13 54.265,148.13 54.568,148.433 54.568,148.437 54.89,148.759 55.995,148.759 56.355,148.399 56.355,148.312 56.472,148.195 56.535,148.195 LED89.3@56.6,148.13 57.065,148.13 57.362,148.427 57.362,148.437 57.684,148.759 58.795,148.759 59.155,148.399 59.155,148.312 59.272,148.195 59.335,148.195 LED91.3@59.4,148.13
  Top Copper w0.3: LED91.3@59.4,148.13 59.415,148.145 59.799,148.145 59.99,148.336 v1(60.071,148.336)
  Bottom Copper w0.3: U10.36@57.057,107.097 57.057,108.732 57.233,108.908 60.52,108.908 63.406,111.794 63.406,145.001 v1(60.071,148.336)
R9: LED2.3 LED5.3 LED8.3 LED11.3 LED98.3 LED101.3 LED104.3 LED107.3 LED194.3 LED197.3 LED200.3 LED203.3 U10.39 | length 86.9
  Top Copper w0.2: LED200.3@28.6,150.93 29.305,150.93 29.422,151.047 29.422,151.231 29.744,151.553 30.801,151.553 31.155,151.199 31.155,151.112 31.272,150.995 31.335,150.995 LED203.3@31.4,150.93 31.915,150.93 32.538,151.553 33.601,151.553 33.955,151.199 33.955,151.112 34.072,150.995 34.135,150.995 LED194.3@34.2,150.93 34.709,150.93 35.332,151.553 36.401,151.553 36.755,151.199 36.755,151.112 36.872,150.995 36.935,150.995 LED197.3@37,150.93 37.503,150.93 38.126,151.553 39.201,151.553 39.555,151.199 39.555,151.112 39.672,150.995 39.735,150.995 LED104.3@39.8,150.93 40.297,150.93 40.92,151.553 42.001,151.553 42.355,151.199 42.355,151.112 42.472,150.995 42.535,150.995 LED107.3@42.6,150.93 43.091,150.93 43.714,151.553 44.801,151.553 45.155,151.199 45.155,151.112 45.272,150.995 45.335,150.995 LED98.3@45.4,150.93 45.885,150.93 46.508,151.553 47.601,151.553 47.955,151.199 47.955,151.112 48.072,150.995 48.135,150.995 LED101.3@48.2,150.93 48.679,150.93 49.302,151.553 50.401,151.553 50.755,151.199 50.755,151.112 50.872,150.995 50.935,150.995 LED8.3@51,150.93 51.473,150.93 52.096,151.553 53.201,151.553 53.555,151.199 53.555,151.112 53.672,150.995 53.735,150.995 LED11.3@53.8,150.93 54.267,150.93 54.89,151.553 56.001,151.553 56.355,151.199 56.355,151.112 56.472,150.995 56.535,150.995 LED2.3@56.6,150.93 57.065,150.93 57.362,151.227 57.362,151.231 57.684,151.553 58.801,151.553 59.155,151.199 59.155,151.112 59.272,150.995 59.335,150.995 LED5.3@59.4,150.93
  Top Copper w0.3: LED5.3@59.4,150.93 59.415,150.945 59.805,150.945 59.99,151.13 v1(60.071,151.13)
  Bottom Copper w0.3: U10.39@58.557,107.097 58.557,107.923 58.623,107.989 58.623,108.282 58.798,108.458 60.833,108.458 63.856,111.481 63.856,147.345 v1(60.071,151.13)
R10: LED14.3 LED17.3 LED20.3 LED23.3 LED110.3 LED113.3 LED116.3 LED119.3 LED206.3 LED209.3 LED212.3 LED215.3 U10.44 | length 89.8
  Top Copper w0.2: LED212.3@28.6,153.73 28.665,153.795 29.192,153.795 29.744,154.347 30.807,154.347 31.155,153.999 31.155,153.912 31.272,153.795 31.986,153.795 32.538,154.347 33.607,154.347 33.955,153.999 33.955,153.912 34.072,153.795 34.78,153.795 35.332,154.347 36.407,154.347 36.755,153.999 36.755,153.912 36.872,153.795 37.574,153.795 38.126,154.347 39.207,154.347 39.555,153.999 39.555,153.912 39.672,153.795 40.368,153.795 40.92,154.347 42.007,154.347 42.355,153.999 42.355,153.912 42.472,153.795 43.162,153.795 43.714,154.347 44.807,154.347 45.155,153.999 45.155,153.912 45.272,153.795 45.956,153.795 46.508,154.347 47.607,154.347 47.955,153.999 47.955,153.912 48.072,153.795 48.75,153.795 49.302,154.347 50.407,154.347 50.755,153.999 50.755,153.912 50.872,153.795 51.544,153.795 52.096,154.347 53.207,154.347 53.555,153.999 53.555,153.912 53.672,153.795 54.338,153.795 54.89,154.347 56.007,154.347 56.355,153.999 56.355,153.912 56.472,153.795 57.132,153.795 57.684,154.347 58.807,154.347 59.155,153.999 59.155,153.912 59.272,153.795 59.335,153.795 LED17.3@59.4,153.73
  Top Copper w0.3: LED17.3@59.4,153.73 59.415,153.745 59.811,153.745 59.99,153.924 v1(60.071,153.924)
  Bottom Copper w0.3: v1(60.071,153.924) 64.306,149.689 64.306,107.867 63.754,107.315 63.754,106.498 63.143,105.887 U10.44@60.768,105.887
R11: LED26.3 LED29.3 LED32.3 LED35.3 LED122.3 LED125.3 LED128.3 LED131.3 LED218.3 LED221.3 LED224.3 LED227.3 U10.47 | length 95.1
  Top Copper w0.2: LED224.3@28.6,156.53 29.133,156.53 29.744,157.141 30.813,157.141 31.155,156.799 31.155,156.712 31.272,156.595 31.992,156.595 32.538,157.141 33.613,157.141 33.955,156.799 33.955,156.712 34.072,156.595 34.786,156.595 35.332,157.141 36.413,157.141 36.755,156.799 36.755,156.712 36.872,156.595 37.58,156.595 38.126,157.141 39.213,157.141 39.555,156.799 39.555,156.712 39.672,156.595 40.374,156.595 40.92,157.141 42.013,157.141 42.355,156.799 42.355,156.712 42.472,156.595 43.168,156.595 43.714,157.141 44.813,157.141 45.155,156.799 45.155,156.712 45.272,156.595 45.962,156.595 46.508,157.141 47.613,157.141 47.955,156.799 47.955,156.712 48.072,156.595 48.756,156.595 49.302,157.141 50.413,157.141 50.755,156.799 50.755,156.712 50.872,156.595 51.55,156.595 52.096,157.141 53.213,157.141 53.555,156.799 53.555,156.712 53.672,156.595 54.344,156.595 54.89,157.141 56.013,157.141 56.355,156.799 56.355,156.712 56.472,156.595 57.138,156.595 57.684,157.141 58.813,157.141 59.155,156.799 59.155,156.712 59.272,156.595 59.335,156.595 LED29.3@59.4,156.53
  Top Copper w0.3: LED29.3@59.4,156.53 59.415,156.545 59.817,156.545 59.99,156.718 v1(60.071,156.718)
  Bottom Copper w0.3: v1(60.071,156.718) 64.959,151.83 64.959,105.439 63.906,104.387 U10.47@60.768,104.387
R12: LED37.3 LED39.3 LED43.3 LED45.3 LED133.3 LED135.3 LED139.3 LED141.3 LED229.3 LED231.3 LED233.3 LED235.3 U10.50 | length 100
  Top Copper w0.2: LED233.3@28.6,159.33 29.139,159.33 29.744,159.935 30.819,159.935 31.155,159.599 31.155,159.512 31.272,159.395 31.998,159.395 32.538,159.935 33.619,159.935 33.955,159.599 33.955,159.512 34.072,159.395 34.792,159.395 35.332,159.935 36.419,159.935 36.755,159.599 36.755,159.512 36.872,159.395 37.586,159.395 38.126,159.935 39.219,159.935 39.555,159.599 39.555,159.512 39.672,159.395 40.38,159.395 40.92,159.935 42.019,159.935 42.355,159.599 42.355,159.512 42.472,159.395 43.174,159.395 43.714,159.935 44.819,159.935 45.155,159.599 45.155,159.512 45.272,159.395 45.968,159.395 46.508,159.935 47.619,159.935 47.955,159.599 47.955,159.512 48.072,159.395 48.762,159.395 49.302,159.935 50.419,159.935 50.755,159.599 50.755,159.512 50.872,159.395 51.556,159.395 52.096,159.935 53.219,159.935 53.555,159.599 53.555,159.512 53.672,159.395 54.35,159.395 54.89,159.935 56.019,159.935 56.355,159.599 56.355,159.512 56.472,159.395 57.144,159.395 57.684,159.935 58.819,159.935 59.155,159.599 59.155,159.512 59.272,159.395 59.335,159.395 LED39.3@59.4,159.33
  Top Copper w0.3: LED39.3@59.4,159.33 59.415,159.345 59.823,159.345 59.99,159.512 v1(60.071,159.512)
  Bottom Copper w0.3: v1(60.071,159.512) 65.409,154.174 65.409,104.376 63.605,102.573 63.357,102.573 63.072,102.857 62.658,102.857 62.637,102.836 61.133,102.836 61.083,102.887 U10.50@60.768,102.887
R13: LED50.3 LED53.3 LED56.3 LED59.3 LED146.3 LED149.3 LED152.3 LED155.3 LED242.3 LED245.3 LED248.3 LED251.3 U10.53 | length 104.4
  Top Copper w0.2: LED248.3@28.6,162.13 29.305,162.13 29.422,162.247 29.422,162.407 29.744,162.729 30.825,162.729 31.155,162.399 31.155,162.312 31.272,162.195 31.335,162.195 LED251.3@31.4,162.13 31.939,162.13 32.538,162.729 33.625,162.729 33.955,162.399 33.955,162.312 34.072,162.195 34.135,162.195 LED242.3@34.2,162.13 34.733,162.13 35.332,162.729 36.425,162.729 36.755,162.399 36.755,162.312 36.872,162.195 36.935,162.195 LED245.3@37,162.13 37.527,162.13 38.126,162.729 39.225,162.729 39.555,162.399 39.555,162.312 39.672,162.195 39.735,162.195 LED152.3@39.8,162.13 40.321,162.13 40.92,162.729 42.025,162.729 42.355,162.399 42.355,162.312 42.472,162.195 42.535,162.195 LED155.3@42.6,162.13 43.115,162.13 43.714,162.729 44.825,162.729 45.155,162.399 45.155,162.312 45.272,162.195 45.335,162.195 LED146.3@45.4,162.13 45.909,162.13 46.508,162.729 47.625,162.729 47.955,162.399 47.955,162.312 48.072,162.195 48.135,162.195 LED149.3@48.2,162.13 48.703,162.13 49.302,162.729 50.425,162.729 50.755,162.399 50.755,162.312 50.872,162.195 50.935,162.195 LED56.3@51,162.13 51.497,162.13 52.096,162.729 53.225,162.729 53.555,162.399 53.555,162.312 53.672,162.195 53.735,162.195 LED59.3@53.8,162.13 54.291,162.13 54.89,162.729 56.025,162.729 56.355,162.399 56.355,162.312 56.472,162.195 56.535,162.195 LED50.3@56.6,162.13 57.085,162.13 57.684,162.729 58.825,162.729 59.155,162.399 59.155,162.312 59.272,162.195 59.335,162.195 LED53.3@59.4,162.13
  Top Copper w0.3: LED53.3@59.4,162.13 59.415,162.145 59.829,162.145 59.99,162.306 v1(60.071,162.306)
  Bottom Copper w0.3: v1(60.071,162.306) 65.859,156.518 65.859,104.19 63.791,102.123 63.549,102.123 62.781,101.354 61.732,101.354 61.7,101.386 U10.53@60.768,101.386
R14: LED62.3 LED65.3 LED68.3 LED71.3 LED158.3 LED161.3 LED164.3 LED167.3 LED254.3 LED257.3 LED260.3 LED263.3 U10.2 | length 113.3
  Top Copper w0.2: LED260.3@28.6,164.93 29.305,164.93 29.422,165.047 29.422,165.201 29.744,165.523 30.831,165.523 31.155,165.199 31.155,165.112 31.272,164.995 31.335,164.995 LED263.3@31.4,164.93 31.945,164.93 32.538,165.523 33.631,165.523 33.955,165.199 33.955,165.112 34.072,164.995 34.135,164.995 LED254.3@34.2,164.93 34.739,164.93 35.332,165.523 36.431,165.523 36.755,165.199 36.755,165.112 36.872,164.995 36.935,164.995 LED257.3@37,164.93 37.533,164.93 38.126,165.523 39.231,165.523 39.555,165.199 39.555,165.112 39.672,164.995 39.735,164.995 LED164.3@39.8,164.93 40.327,164.93 40.92,165.523 42.031,165.523 42.355,165.199 42.355,165.112 42.472,164.995 42.535,164.995 LED167.3@42.6,164.93 43.121,164.93 43.714,165.523 44.831,165.523 45.155,165.199 45.155,165.112 45.272,164.995 45.335,164.995 LED158.3@45.4,164.93 45.915,164.93 46.508,165.523 47.631,165.523 47.955,165.199 47.955,165.112 48.072,164.995 48.135,164.995 LED161.3@48.2,164.93 48.709,164.93 49.302,165.523 50.431,165.523 50.755,165.199 50.755,165.112 50.872,164.995 50.935,164.995 LED68.3@51,164.93 51.503,164.93 52.096,165.523 53.231,165.523 53.555,165.199 53.555,165.112 53.672,164.995 53.735,164.995 LED71.3@53.8,164.93 54.297,164.93 54.89,165.523 56.031,165.523 56.355,165.199 56.355,165.112 56.472,164.995 56.535,164.995 LED62.3@56.6,164.93 57.091,164.93 57.684,165.523 58.831,165.523 59.155,165.199 59.155,165.112 59.272,164.995 59.335,164.995 LED65.3@59.4,164.93
  Top Copper w0.3: LED65.3@59.4,164.93 59.415,164.945 59.835,164.945 59.99,165.1 v1(60.071,165.1)
  Bottom Copper w0.3: U10.2@59.557,99.176 59.557,98.725 60.238,98.044 63.88,98.044 66.309,100.473 66.309,158.862 v1(60.071,165.1)
R15: LED74.3 LED76.3 LED78.3 LED80.3 LED170.3 LED172.3 LED174.3 LED176.3 LED266.3 LED268.3 LED270.3 LED272.3 U10.5 | length 119.4
  Top Copper w0.2: LED270.3@28.6,167.73 29.157,167.73 29.744,168.317 30.837,168.317 31.155,167.999 31.155,167.912 31.272,167.795 32.016,167.795 32.538,168.317 33.637,168.317 33.955,167.999 33.955,167.912 34.072,167.795 34.81,167.795 35.332,168.317 36.437,168.317 36.755,167.999 36.755,167.912 36.872,167.795 37.604,167.795 38.126,168.317 39.237,168.317 39.555,167.999 39.555,167.912 39.672,167.795 40.398,167.795 40.92,168.317 42.037,168.317 42.355,167.999 42.355,167.912 42.472,167.795 43.192,167.795 43.714,168.317 44.837,168.317 45.155,167.999 45.155,167.912 45.272,167.795 45.986,167.795 46.508,168.317 47.637,168.317 47.955,167.999 47.955,167.912 48.072,167.795 48.78,167.795 49.302,168.317 50.437,168.317 50.755,167.999 50.755,167.912 50.872,167.795 51.574,167.795 52.096,168.317 53.237,168.317 53.555,167.999 53.555,167.912 53.672,167.795 54.368,167.795 54.89,168.317 56.037,168.317 56.355,167.999 56.355,167.912 56.472,167.795 57.162,167.795 57.684,168.317 58.837,168.317 59.155,167.999 59.155,167.912 59.272,167.795 59.335,167.795 LED76.3@59.4,167.73
  Top Copper w0.3: LED270.3@28.6,167.73 28.615,167.745 28.615,168.107 28.829,168.321 v1(28.829,168.402) ; LED76.3@59.4,167.73 59.415,167.745 59.841,167.745 59.99,167.894 v1(60.071,167.894)
  Bottom Copper w0.3: U10.5@58.057,99.176 58.057,97.772 58.293,97.536 64.008,97.536 66.759,100.287 66.759,161.206 v1(60.071,167.894)
R16: LED82.3 LED84.3 LED86.3 LED88.3 LED178.3 LED180.3 LED182.3 LED184.3 LED274.3 LED276.3 LED278.3 LED280.3 U11.8 | length 109.2
  Top Copper w0.2: LED278.3@28.6,170.53 29.305,170.53 29.422,170.647 29.422,170.789 29.744,171.111 30.843,171.111 31.155,170.799 31.155,170.712 31.272,170.595 31.335,170.595 LED280.3@31.4,170.53 31.957,170.53 32.538,171.111 33.643,171.111 33.955,170.799 33.955,170.712 34.072,170.595 34.135,170.595 LED274.3@34.2,170.53 34.751,170.53 35.332,171.111 36.443,171.111 36.755,170.799 36.755,170.712 36.872,170.595 36.935,170.595 LED276.3@37,170.53 37.545,170.53 38.126,171.111 39.243,171.111 39.555,170.799 39.555,170.712 39.672,170.595 39.735,170.595 LED182.3@39.8,170.53 40.339,170.53 40.92,171.111 42.043,171.111 42.355,170.799 42.355,170.712 42.472,170.595 42.535,170.595 LED184.3@42.6,170.53 43.133,170.53 43.714,171.111 44.843,171.111 45.155,170.799 45.155,170.712 45.272,170.595 45.335,170.595 LED178.3@45.4,170.53 45.927,170.53 46.508,171.111 47.643,171.111 47.955,170.799 47.955,170.712 48.072,170.595 48.135,170.595 LED180.3@48.2,170.53 48.721,170.53 49.302,171.111 50.443,171.111 50.755,170.799 50.755,170.712 50.872,170.595 50.935,170.595 LED86.3@51,170.53 51.515,170.53 52.096,171.111 53.243,171.111 53.555,170.799 53.555,170.712 53.672,170.595 53.735,170.595 LED88.3@53.8,170.53 54.309,170.53 54.89,171.111 56.043,171.111 56.355,170.799 56.355,170.712 56.472,170.595 56.535,170.595 LED82.3@56.6,170.53 57.103,170.53 57.684,171.111 58.843,171.111 59.155,170.799 59.155,170.712 59.272,170.595 LED84.3@59.335,170.595
  Top Copper w0.3: U11.8@27.703,107.237 27.703,107.718 28.448,108.463 28.448,108.712 28.222,108.938 25.953,108.938 25.304,109.588 24.523,109.588 24.347,109.764 24.347,109.766 24.105,110.008 24.105,168.352 26.949,171.196 v1(28.829,171.196) 28.829,171.115 28.615,170.901 28.615,170.545 LED278.3@28.6,170.53 ; LED84.3@59.335,170.595 59.766,170.595 59.801,170.631 60.014,170.631 v1(60.071,170.688)
  Bottom Copper w0.3: v1(60.071,170.688) v1@60.128,170.745
R17: LED90.3 LED92.3 LED94.3 LED96.3 LED186.3 LED188.3 LED190.3 LED192.3 LED282.3 LED284.3 LED286.3 LED288.3 U11.11 | length 109.9
  Top Copper w0.2: LED286.3@28.6,173.33 29.305,173.33 29.422,173.447 29.422,173.583 29.744,173.905 30.849,173.905 31.155,173.599 31.155,173.512 31.272,173.395 31.335,173.395 LED288.3@31.4,173.33 31.963,173.33 32.538,173.905 33.649,173.905 33.955,173.599 33.955,173.512 34.072,173.395 34.135,173.395 LED282.3@34.2,173.33 34.757,173.33 35.332,173.905 36.449,173.905 36.755,173.599 36.755,173.512 36.872,173.395 36.935,173.395 LED284.3@37,173.33 37.551,173.33 38.126,173.905 39.249,173.905 39.555,173.599 39.555,173.512 39.672,173.395 39.735,173.395 LED190.3@39.8,173.33 40.345,173.33 40.92,173.905 42.049,173.905 42.355,173.599 42.355,173.512 42.472,173.395 42.535,173.395 LED192.3@42.6,173.33 43.139,173.33 43.714,173.905 44.849,173.905 45.155,173.599 45.155,173.512 45.272,173.395 45.335,173.395 LED186.3@45.4,173.33 45.933,173.33 46.508,173.905 47.649,173.905 47.955,173.599 47.955,173.512 48.072,173.395 48.135,173.395 LED188.3@48.2,173.33 48.727,173.33 49.302,173.905 50.449,173.905 50.755,173.599 50.755,173.512 50.872,173.395 50.935,173.395 LED94.3@51,173.33 51.521,173.33 52.096,173.905 53.249,173.905 53.555,173.599 53.555,173.512 53.672,173.395 53.735,173.395 LED96.3@53.8,173.33 54.315,173.33 54.89,173.905 56.049,173.905 56.355,173.599 56.355,173.512 56.472,173.395 56.535,173.395 LED90.3@56.6,173.33 57.109,173.33 57.684,173.905 58.849,173.905 59.155,173.599 59.155,173.512 59.272,173.395 LED92.3@59.335,173.395
  Top Copper w0.3: U11.11@26.203,107.237 26.203,108.036 25.273,108.966 24.003,108.966 23.655,109.314 23.655,170.696 26.949,173.99 v1(28.829,173.99) 28.829,173.909 28.615,173.695 28.615,173.345 LED286.3@28.6,173.33 ; LED92.3@59.335,173.395 59.364,173.425 60.014,173.425 v1(60.071,173.482)
R18: LED3.3 LED6.3 LED9.3 LED12.3 LED99.3 LED102.3 LED105.3 LED108.3 LED195.3 LED198.3 LED201.3 LED204.3 U11.14 | length 113
  Top Copper w0.2: LED201.3@28.6,176.13 29.305,176.13 29.422,176.247 29.422,176.377 29.744,176.699 30.855,176.699 31.155,176.399 31.155,176.312 31.272,176.195 31.335,176.195 LED204.3@31.4,176.13 31.969,176.13 32.538,176.699 33.655,176.699 33.955,176.399 33.955,176.312 34.072,176.195 34.135,176.195 LED195.3@34.2,176.13 34.763,176.13 35.332,176.699 36.455,176.699 36.755,176.399 36.755,176.312 36.872,176.195 36.935,176.195 LED198.3@37,176.13 37.557,176.13 38.126,176.699 39.255,176.699 39.555,176.399 39.555,176.312 39.672,176.195 39.735,176.195 LED105.3@39.8,176.13 40.351,176.13 40.92,176.699 42.055,176.699 42.355,176.399 42.355,176.312 42.472,176.195 42.535,176.195 LED108.3@42.6,176.13 43.145,176.13 43.714,176.699 44.855,176.699 45.155,176.399 45.155,176.312 45.272,176.195 45.335,176.195 LED99.3@45.4,176.13 45.939,176.13 46.508,176.699 47.655,176.699 47.955,176.399 47.955,176.312 48.072,176.195 48.135,176.195 LED102.3@48.2,176.13 48.733,176.13 49.302,176.699 50.455,176.699 50.755,176.399 50.755,176.312 50.872,176.195 50.935,176.195 LED9.3@51,176.13 51.527,176.13 52.096,176.699 53.255,176.699 53.555,176.399 53.555,176.312 53.672,176.195 53.735,176.195 LED12.3@53.8,176.13 54.321,176.13 54.89,176.699 56.055,176.699 56.355,176.399 56.355,176.312 56.472,176.195 56.535,176.195 LED3.3@56.6,176.13 57.115,176.13 57.684,176.699 58.855,176.699 59.155,176.399 59.155,176.312 59.272,176.195 59.335,176.195 LED6.3@59.4,176.13
  Top Copper w0.3: U11.14@24.703,107.237 24.109,107.237 23.755,107.591 23.755,108.284 23.205,108.834 23.205,174.694 25.295,176.784 v1(28.829,176.784) 28.829,176.703 28.615,176.489 28.615,176.145 LED201.3@28.6,176.13 ; LED6.3@59.4,176.13 59.415,176.145 59.859,176.145 59.99,176.276 v1(60.071,176.276)